# Altium PCB 400589.PcbDoc
Units mm, origin at the board's own origin, x right, y up, seen from the top; angles counter-clockwise.
Board outline 10.16 x 10.16 mm, 2 copper layers (Top Layer, Bottom Layer); 19 components, 14 nets, 51 pads, 50 vias.
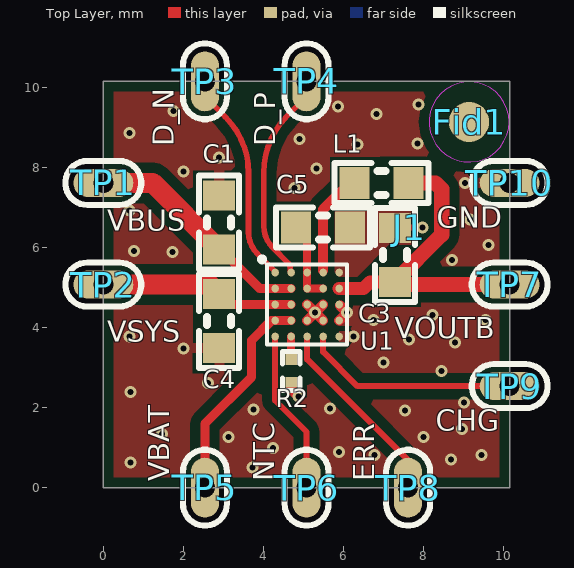
[diagram p0: Top Layer view]
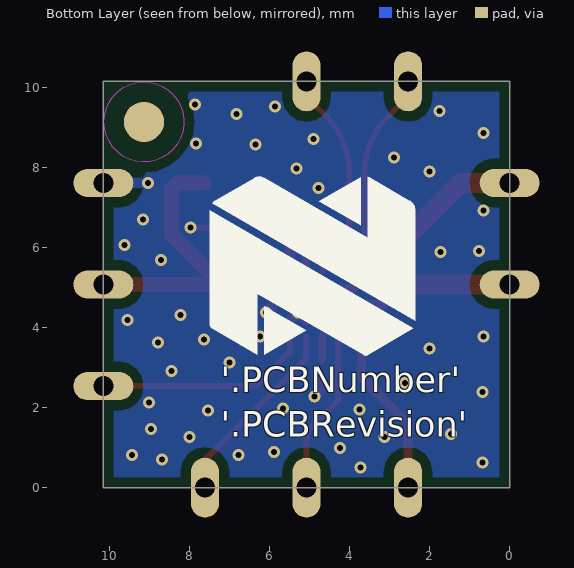
[diagram p1: Bottom Layer view, seen from below]

## Layer stack, top to bottom
Top Solder: solder mask 0.01, Solder Resist, Dk 3.5
Top Layer: signal copper 0.036
Dielectric1: core 0.32, FR-4, Dk 4.8
Bottom Layer: signal copper 0.036
Bottom Solder: solder mask 0.01, Solder Resist, Dk 3.5

## Board outline
0,0 10.16,0 10.16,10.16 0,10.16

## Design rules (kind name [scope] priority, off if disabled: settings)
BoardOutlineClearance [All] p1: gap=0.254 ignorepadtopadclearanceinfootprint=FALSE except(0: Arc-SplitContinuation Track-SplitContinuation SMDPad-SplitContinuation THPad-SplitContinuation Via-SplitContinuation Fill-SplitContinuation Poly-SplitContinuation Region-SplitContinuation Text-SplitContinuation)
Clearance Clearance_microvia [AsMM(ViaDiameter) = 0.3 vs AsMM(ViaDiameter) = 0.3] p1: gap=0.1 ignorepadtopadclearanceinfootprint=FALSE except(0: Arc-Hole Track-Hole SMDPad-Hole THPad-Hole Via-Hole Fill-Hole Poly-Hole Region-Hole Text-Hole)
Clearance ANT_Clerance [InNet('ANT')] p2: gap=0.127 ignorepadtopadclearanceinfootprint=FALSE except(0: Arc-Hole Track-Hole SMDPad-Hole THPad-Hole Via-Hole Fill-Hole Poly-Hole Region-Hole Text-Hole)
Clearance Polygon_Clearance [(InNamedPolygon('Top_Layer-GND')) or (InNamedPolygon('Bottom_Layer-GND')) or (InNamedPolygon('Mid_Layer_1-GND')) or (InNamedPolygon('Mid_Layer_2-GND'))] p3: gap=0.254 ignorepadtopadclearanceinfootprint=FALSE except(0: Arc-Hole Track-Hole SMDPad-Hole THPad-Hole Via-Hole Fill-Hole Poly-Hole Region-Hole Text-Hole)
Clearance [All] p4: gap=0.125 ignorepadtopadclearanceinfootprint=FALSE
ComponentClearance [All] p1 off: gap=0.254 collisioncheckmode=3 verticalgap=0.254 showdistances=FALSE
DiffPairsRouting [All] p1: maxlimit=0.254 minlimit=0.241 mostfreqgap=0.241 toplayer_minwidth=0.14 toplayer_maxwidth=0.381 toplayer_prefwidth=0.14 bottomlayer_minwidth=0.14 bottomlayer_maxwidth=0.381 bottomlayer_prefwidth=0.14 maxuncoupledlength=12.7
FabricationTestPointUsage TestPointUsage [All] p1: valid=0 allowmultiple=FALSE
FabricationTestpoint Testpoint [All] p1: side=3 testpointundercomponent=TRUE minsize=1.016 maxsize=2.54 preferedsize=1.524 minholesize=0 maxholesize=1.016 preferedholesize=0.813 testpointgrid=0.025 allowsidetop=TRUE allowsidebottom=TRUE usegrid=TRUE gridtolerance=0
Height [All] p1 off: minheight=0 maxheight=25.4 prefheight=12.7
HoleSize [All] p1: absolutevalues=TRUE maxlimit=5 minlimit=0.1 maxpercent=80.000 minpercent=20.000
HoleToHoleClearance HoleToHoleClearance_L1L2 [InDrillLayerPair('Top Layer - Mid-Layer 1') vs InDrillLayerPair('Top Layer - Mid-Layer 1')] p1: gap=0.225 allowstackedmicrovias=TRUE
HoleToHoleClearance HoleToHoleClearance_L1L2_L1L3 [InDrillLayerPair('Top Layer - Mid-Layer 1') vs InDrillLayerPair('Top Layer - Mid-Layer 2')] p2: gap=0.225 allowstackedmicrovias=TRUE
HoleToHoleClearance HoleToHoleClearance_L1L3 [InDrillLayerPair('Top Layer - Mid-Layer 2') vs InDrillLayerPair('Top Layer - Mid-Layer 2')] p3: gap=0.225 allowstackedmicrovias=TRUE
HoleToHoleClearance HoleToHoleClearance_L1L3_L3L4 [InDrillLayerPair('Top Layer - Mid-Layer 2') vs InDrillLayerPair('Mid-Layer 2 - Mid-Layer 3')] p4: gap=0.225 allowstackedmicrovias=TRUE
HoleToHoleClearance HoleToHoleClearance_L3L4 [InDrillLayerPair('Mid-Layer 2 - Mid-Layer 3') vs InDrillLayerPair('Mid-Layer 2 - Mid-Layer 3')] p5: gap=0.225 allowstackedmicrovias=TRUE
HoleToHoleClearance HoleToHoleClearance_L3L4_L4L6 [InDrillLayerPair('Mid-Layer 2 - Mid-Layer 3') vs InDrillLayerPair('Mid-Layer 3 - Bottom Layer')] p6: gap=0.225 allowstackedmicrovias=TRUE
HoleToHoleClearance HoleToHoleClearance_L4L6 [InDrillLayerPair('Mid-Layer 3 - Bottom Layer') vs InDrillLayerPair('Mid-Layer 3 - Bottom Layer')] p7: gap=0.225 allowstackedmicrovias=TRUE
HoleToHoleClearance HoleToHoleClearance_L1L2_L1L6 [InDrillLayerPair('Top Layer - Mid-Layer 1') vs InDrillLayerPair('Top Layer - Bottom Layer')] p8: gap=0.275 allowstackedmicrovias=FALSE
HoleToHoleClearance HoleToHoleClearance_L1L3_L1L6 [InDrillLayerPair('Top Layer - Mid-Layer 2') vs InDrillLayerPair('Top Layer - Bottom Layer')] p9: gap=0.275 allowstackedmicrovias=FALSE
HoleToHoleClearance HoleToHoleClearance_L3L4_L1L6 [InDrillLayerPair('Mid-Layer 2 - Mid-Layer 3') vs InDrillLayerPair('Top Layer - Bottom Layer')] p10: gap=0.275 allowstackedmicrovias=FALSE
HoleToHoleClearance HoleToHoleClearance_L4L6_L1L6 [InDrillLayerPair('Mid-Layer 3 - Bottom Layer') vs InDrillLayerPair('Top Layer - Bottom Layer')] p11: gap=0.275 allowstackedmicrovias=FALSE
HoleToHoleClearance HoleToHoleClearance_L1L6 [InDrillLayerPair('Top Layer - Bottom Layer') vs InDrillLayerPair('Top Layer - Bottom Layer')] p12: gap=0.45 allowstackedmicrovias=FALSE
MinimumAnnularRing [All] p1 off: minimumring=0.152
PolygonConnect PolygonConnect_1 [isVia and innet(gnd) or InNet('PVSS')] p1: connectstyle=Direct reliefconductorwidth=0.254 reliefentries=4 polygonreliefangle="90 Angle" airgapwidth=0.254
PolygonConnect [All] p2: connectstyle=Relief reliefconductorwidth=0.254 reliefentries=4 polygonreliefangle="90 Angle" airgapwidth=0.254
RoutingVias [All] p1: holewidth=0.305 width=0.61 viastyle="Through Hole" minholewidth=0.1 minwidth=0.3 maxholewidth=0.711 maxwidth=1.27 useviatemplates=TRUE viatemplateguid#1={46AA5E60-8EE7-483D-A1B2-04B1209392C7} viatemplatename#1=v30h15m0mx0
SilkToSolderMaskClearance SilkscreenOverComponentPads [IsPad] p1: minsilkscreentomaskgap=0.254 clearancetoexposedcopper=TRUE
SolderMaskExpansion [IsVia] p1: expansion=0.076 istentingtop=TRUE
Width [All] p1: maxlimit=0.508 minlimit=0.15 preferedwidth=0.305 minimp=50.000000 maximp=50.000000 favimp=50.000000
22 further rules are at their usual default settings.

## Classes and differential pairs
differential pair class USB: D
differential pair D: +D_P -D_N

## Components (designator, comment, footprint, x,y, rotation, side; value= is the part's Value field where it differs from the comment)
C1 "2.2µF" CAPC1608X06L 2.896,6.629 r270 top
C3 "10µF" CAPC1608X06L 7.29,5.817 r270 top
C4 "10µF" CAPC1608X06L 2.896,4.166 r90 top
C5 "10µF" CAPC1608X06L 5.496,6.502 r180 top
Fid1 "Fiducial mark" Fiducial 9.144,9.144 r0 top
J1 "N.A." "2 PIN STARPOINT" 7.645,6.502 r180 top net-tie
L1 "2.2µH" INDC1608X06L 6.96,7.62 r0 top
R2 "0R" RESC0603X03L_C 4.699,2.921 r90 top
TP1 "TP" "TESTPAD-TH - 0.5mm" 0,7.62 r90 top
TP2 "TP" "TESTPAD-TH - 0.5mm" 0,5.08 r90 top
TP3 "TP" "TESTPAD-TH - 0.5mm" 2.54,10.16 r0 top
TP4 "TP" "TESTPAD-TH - 0.5mm" 5.08,10.16 r0 top
TP5 "TP" "TESTPAD-TH - 0.5mm" 2.54,0 r0 top
TP6 "TP" "TESTPAD-TH - 0.5mm" 5.08,0 r0 top
TP7 "TP" "TESTPAD-TH - 0.5mm" 10.16,5.08 r270 top
TP8 "TP" "TESTPAD-TH - 0.5mm" 7.62,0 r0 top
TP9 "TP" "TESTPAD-TH - 0.5mm" 10.16,2.54 r90 top
TP10 "TP" "TESTPAD-TH - 0.5mm" 10.16,7.62 r90 top
U1 "nPM1100-CAAAC0" BGA25C40P5X5_200X200X50 5.096,4.58 r0 top locked

## Footprints (in the part's own frame and the unit in brackets; to place one, negate y for a bottom-side part, rotate by r counter-clockwise, add the part's x,y. Pads: shape width x height; smd on the part's side, far side on the other; paste and mask are expansions set on the pad)
"2 PIN STARPOINT" [mil]
  round 5.98 smd paste-196.85 mask-196.85: 1(8,0) 2(-8,0)
  Top Layer region: -11,-3 11,-3 11,3 -11,3
BGA25C40P5X5_200X200X50 [mm] "BGA, 25-Leads, Body 2.00x2.00mmx0.50mm, Pitch 0.40mm"
  round 0.193 smd mask+0.075: A1(-0.8,0.8) A2(-0.4,0.8) A3(0,0.8) A4(0.4,0.8) A5(0.8,0.8) B1(-0.8,0.4) B2(-0.4,0.4) B3(0,0.4) B4(0.4,0.4) B5(0.8,0.4) C1(-0.8,0) C2(-0.4,0) C3(0,0) C4(0.4,0) C5(0.8,0) D1(-0.8,-0.4) D2(-0.4,-0.4) D3(0,-0.4) D4(0.4,-0.4) D5(0.8,-0.4) E1(-0.8,-0.8) E2(-0.4,-0.8) E3(0,-0.8) E4(0.4,-0.8) E5(0.8,-0.8)
  silkscreen extent -1.18,-1 1,1.18, body extent -1,-1 1,1, height 0.5
CAPC1608X06L [mm] "Chip Capacitor, 2-Leads, Body 1.6x0.8mm, IPC High Density"
  rect 0.75x0.8 smd: 1(-0.675,0) 2(0.675,0)
  silkscreen extent -1.17,-0.5 1.17,0.5, body extent -0.8,-0.43 0.8,0.43, height 0.8
Fiducial [mm] "Fiducial Mark"
  round 1 smd paste-1 mask+0.5: 0(0,0)
  round 1 smd far side paste-1 mask+0.5: 0(0,0)
  Top Layer keep-out circle w0.01: c0,0 r1
  Bottom Layer keep-out circle w0.01: c0,0 r1
INDC1608X06L [mm] "Chip Inductor, 2-Leads, Body 1.6x0.8mm, IPC High Density"
  rect 0.75x0.8 smd: 1(-0.675,0) 2(0.675,0)
  silkscreen extent -1.17,-0.5 1.17,0.5, body extent -0.8,-0.48 0.8,0.48, height 0.8
RESC0603X03L_C [mm] "Chip Resistor, 2-Leads, Body 0.6x0.3mm, IPC High Density"
  rect 0.27x0.3 smd: 1(-0.285,0) 2(0.285,0)
  silkscreen extent -0.49,-0.22 0.49,0.22, body extent -0.3,-0.15 0.3,0.15, height 0.23
"TESTPAD-TH - 0.5mm" [mm]
  oval 0.7x1.5 hole 0.5: 1(0,0)
  silkscreen extent -0.55,-0.95 0.55,0.95

## Part data
C1: library part C0603-2µ2-25V-X5R, "Capacitor, Ceramic, X5R, ±10%, 25V", Manufacturer=Murata, Manufacturer Part Number=GRM188R61E225KA12D, Part number IPS=N.A., Supplier Part Number 1=490-10731-1-ND, Artikkelnr Noca=N.A., Author=rsk, Component Class=Capacitors, ComponentLink1Description=Datasheet, ComponentLink1URL=https://search.murata.co.jp/Ceramy/image/img/A01X/G101/ENG/GRM188R61E225KA12-01.pdf, ComponentLink2Description="Supplier link", ComponentLink2URL=https://www.murata.com/en-global/products/productdetail?partno=GRM188R61E225KA12%23, Footprint Doc=0603, HelpURL=N.A., LatestRevisionDate=2020-12-16, Note=25V, Pad Count=2, Part Number=C0603-2µ2-25V-X5R, Part number Norautron=N.A., PartId=100200454, Published=2020-12-16, Supplier 1=Digi-Key, Supplier 2=Mouser, Supplier Part Number 2=81-GRM188R61E225KA2D
C3 C4 C5: library part 0603-10u-10V-X7T-GRM188, "CAP CER 10UF 10V X7T 0603", Manufacturer=Murata, Manufacturer Part Number=GRM188D71A106MA73, Part number IPS=00000004696, Supplier Part Number 1=490-7200-1-ND, Artikkelnr Noca=N.A., Component Class=Capacitors, ComponentLink1Description=Datasheet, ComponentLink1URL=N.A., ComponentLink2Description="Supplier link", ComponentLink2URL=N.A., Footprint Doc=0603, HelpURL=https://no.mouser.com/datasheet/2/281/murata_03052018_GRM_Series_1-1310166.pdf, LatestRevisionDate=2020-10-13, Note=10VDC, Pad Count=2, Part Number=0603-10u-10V-X7T-GRM188, PartId=100200414, Published=2018-09-11, Publisher="Nordic Semiconductor", Supplier 1=Digi-Key, Supplier 2=Mouser, Supplier Part Number 2=81-GRM188D71A106MA3D
Fid1: library part Fid-Mark, "Fiducial Mark", Part number IPS=N.A., Artikkelnr Noca=N.A., Component Class=Connectors, ComponentLink1Description=Datasheet, ComponentLink2Description="Supplier link", Footprint Doc=Fiducial, LatestRevisionDate=2009-12-12, Pad Count=1, Part Number=Fid-Mark, PartId=100500073, Published=2009-12-12, Publisher="Nordic Semiconductor"
J1: library part "2 pin starpoint", "Starpoint", Artikkelnr Noca=N.A., Component Class=Connectors, ComponentLink1Description=Datasheet, ComponentLink1URL=N.A., ComponentLink2Description="Supplier link", ComponentLink2URL=N.A., Footprint Doc=N.A., HelpURL=N.A., LatestRevisionDate=2017-08-31, Manufacturer=N.A., Manufacturer Part Number=N.A., Note=N.A., Pad Count=2, Part Number="2 pin starpoint", Part number IPS=N.A., PartId=100500603, Pin Count=2, Published=2017-08-31, Publisher="Nordic Semiconductor", Supplier 1=N.A., Supplier 2=N.A., Supplier Part Number 1=N.A., Supplier Part Number 2=N.A.
L1: library part BRL1608T2R2M, "FIXED IND 2.2UH 500MA 520 MOHM", Manufacturer="Taiyo Yuden", Part number IPS=N.A., Supplier Part Number 1=587-2899-1-ND, Artikkelnr Noca=N.A., Component Class=Inductors, ComponentLink1Description=Datasheet, ComponentLink1URL=N.A., ComponentLink2Description="Supplier link", ComponentLink2URL=http://ds.yuden.co.jp/TYCOMPAS/or/detail.do?productNo=BRL1608T2R2M&dataUnit=M, Footprint Doc=0603, HelpURL=N.A., LatestRevisionDate=2018-04-18, Manufacturer Part Number=BRL1608T2R2M, Note="-40°C ~ 105°C", Pad Count=2, Part Number=BRL1608T2R2M, PartId=100300091, Published=2018-04-18, Supplier 1=Digi-Key, Supplier 2=N.A., Supplier Part Number 2=N.A.
R2: library part R0201-0R, "Resistor, ±5%, 0.05W", Manufacturer=N.A., Part number IPS=00000003245, Artikkelnr Noca=N.A., Component Class=Resistors, ComponentLink1Description=Datasheet, ComponentLink1URL=N.A., ComponentLink2Description="Supplier link", ComponentLink2URL=N.A., Footprint Doc=0201, HelpURL=N.A., LatestRevisionDate=2017-11-09, Manufacturer Part Number=N.A., Note="Chip Res 5%", Pad Count=2, Part Number=R0201-0R, PartId=100100001, Published=2014-11-13, Supplier 1=N.A., Supplier 2=N.A., Supplier Part Number 1=N.A., Supplier Part Number 2=N.A.
TP1 TP2 TP3 TP4 TP5 TP6 TP7 TP8 TP9 TP10: library part "Testpoint TH 0.5mm", "Testpoint, through hole", Manufacturer=N.A., Artikkelnr Noca=N.A., Component Class=Connectors, ComponentLink1Description=Datasheet, ComponentLink1URL=N.A., ComponentLink2Description="Supplier link", ComponentLink2URL=N.A., Footprint Doc=N.A., HelpURL=N.A., LatestRevisionDate=2016-04-22, Manufacturer Part Number=N.A., Note=N.A., Pad Count=1, Part Number="Testpoint TH 0.5mm", Part number IPS=N.A., PartId=100500558, Published=2016-04-22, Supplier 1=N.A., Supplier 2=N.A., Supplier Part Number 1=N.A., Supplier Part Number 2=N.A.
U1: "Li-Ion/Li-Polymer USB battery charger with a high efficiency buck regulator", Manufacturer="Nordic Semiconductor", Part number IPS=N.A., Artikkelnr Noca=N.A., Author=rubr, Component Class=nRF_Devices, ComponentLink1Description=Datasheet, ComponentLink1URL=N.A., ComponentLink2Description="Supplier link", ComponentLink2URL=N.A., Footprint Doc=WLCSP-25, HelpURL=N.A., LatestRevisionDate=2021-04-21, Manufacturer Part Number=nPM1100-CAAAC0, Note=N.A., Pad Count=25, Part Number=nPM1100-CAAAC0, Part number Norautron=N.A., PartId=102000225, Published=2021-04-21, Supplier 1="Nordic Semiconductor", Supplier 2=N.A., Supplier Part Number 1=N.A., Supplier Part Number 2=N.A.

## Via types
v1: diameter 0.3/0.3 (per signal layer), hole 0.15, Top Layer to Bottom Layer, tented both sides, 46 vias
v2: diameter 0.3, hole 0.15, Top Layer to Bottom Layer, tented both sides, 4 vias

## Nets (pads, with @x,y where several pads share a name; then routed paths per layer and width w, separated by ;. In a path a pad name is that pad's centre, name@x,y a point inside that pad or via, vN(x,y) a via of type N, cw(c..) or ccw(c..) an arc to the next point about the centre after c; other vN are vias at no path point)
CHG: TP9.1 U1.E4 | length 5.4
  Top Layer w0.152: U1.E4 5.496,3.394 6.35,2.54 TP9.1
D_N: TP3.1 U1.A1 | length 5.4
  Top Layer w0.14: TP3.1 2.54,9.779 3.054,9.265 cw(c1.663,7.874) 3.63,7.874 3.63,6.388 ccw(c4.404,6.388) 3.857,5.84 4.281,5.417 cw(c4.243,5.38) U1.A1
D_P: TP4.1 U1.A2 | length 5.4
  Top Layer w0.14: U1.A2 cw(c4.742,5.426) 4.677,5.426 4.677,5.479 ccw(c4.483,5.479) 4.62,5.616 4.238,5.998 cw(c4.785,6.545) 4.011,6.545 4.011,7.874 cw(c6.03,7.874) 4.603,9.302 5.08,9.779 TP4.1
DEC: C5.2 U1.A3 U1.B3 U1.B4 | length 2.2
  Top Layer w0.2: C5.2@4.821,6.68 5.096,6.405 U1.A3 U1.B3 U1.B4
ERR: TP8.1 U1.E3 | length 4.8
  Top Layer w0.15: U1.E3 5.096,3.21 7.62,0.686 TP8.1
GND: C1.1 C4.1 J1.2 R2.1 TP10.1 U1.C3 U1.C4 U1.C5 U1.D3 U1.D4 U1.D5 U1.E5 | length 2.1
  Top Layer w0.254: R2.1 4.699,2.464 v1(4.877,2.286) ; U1.D3 v2(5.296,4.38) ; U1.C3 v2(5.296,4.38) ; U1.D4 v2(5.296,4.38) ; U1.C4 v2(5.296,4.38) ; U1.D5 v2(6.096,4.38) U1.C5@5.924,4.552
  other v1: 3.734,0.508 0.686,0.635 8.687,0.711 6.782,0.813 9.449,0.813 5.893,0.889 4.242,0.991 3.124,1.27 8.001,1.27 1.473,1.346 8.966,1.473 7.544,1.93 3.759,1.956 5.664,1.981 9.017,2.134 0.686,2.388 2.616,2.616 8.458,2.921 7.01,3.124 2.007,3.48 8.788,3.632 7.645,3.708 0.66,3.785 6.756,4.191 9.55,4.191 8.23,4.318 8.712,5.69 1.727,5.893 0.762,5.918 9.627,6.071 9.169,6.706 0.66,6.934 4.775,7.493 9.042,7.62 2.007,7.899 5.334,7.976 2.896,8.255 6.35,8.585 7.849,8.611 4.902,8.712 0.66,8.865 6.833,9.347 1.753,9.423 5.867,9.525 7.874,9.576
  other v2: 6.248,3.785 7.976,6.502
ICHG: R2.2 U1.E2 | length 0.6
  Top Layer w0.203: R2.2@4.696,3.206 U1.E2
NetL1_1: L1.1 U1.A4 | length 2.6
  Top Layer w0.25: U1.A4@5.496,5.43 5.496,6.96 6.156,7.62 L1.1
NTC: TP6.1 U1.E1 | length 4.1
  Top Layer w0.15: U1.E1 4.296,2.181 5.08,1.397 TP6.1
PVSS: C3.1 C5.1 J1.1 U1.A5
VBAT: TP5.1 U1.D1 U1.D2 | length 5.4
  Top Layer w0.229: TP5.1 2.54,1.6 3.708,2.769 3.708,3.683 4.205,4.18 U1.D1 U1.D2
VBUS: C1.2 TP1.1 U1.B1 U1.B2 | length 5.8
  Top Layer w0.229: C1.2 2.936,5.954 3.91,4.98 U1.B1 U1.B2
  Top Layer w0.508: TP1.1 1.23,7.62 C1.2
VOUTB: C3.2 L1.2 TP7.1 U1.B5 | length 8.1
  Top Layer w0.33: U1.B5 6.504,4.98 6.666,5.142 C3.2
  Top Layer w0.381: L1.2 8.306,7.62 8.458,7.468 8.458,6.325 7.29,5.156 C3.2 7.351,5.08 TP7.1
VSYS: C4.2 TP2.1 U1.C1 U1.C2 | length 4.9
  Top Layer w0.229: C4.2 3.156,4.58 U1.C1 U1.C2
  Top Layer w0.508: TP2.1 2.656,5.08 C4.2
pads on no net: Fid1.0

## Polygon pours and split planes (outlines as drawn)
GND on Top Layer "Top_Layer-GND" (solid, remove dead copper, pour order 14): 0,0 0,10.16 10.16,10.16 10.16,0
PVSS on Top Layer "PVSS_L01_P013" (solid, pour order 13): 5.791,5.258 5.791,6.909 7.696,6.909 7.696,6.071 7.137,6.071 6.325,5.258
GND on Bottom Layer "Bottom_Layer-GND" (solid, remove dead copper, pour order 11): 0,0 0,10.16 10.16,10.16 10.16,0

## Other copper
Top Layer:
  pour cut-out: 6.22,8.153 7.571,8.153 7.571,7.061 6.221,7.061
  pour cut-out: 7.722,6.909 7.722,6.109 8.179,6.109 8.179,6.909

## Silkscreen, mask and mechanical layers (free items; w line width, h text height)
Top Overlay:
  text "D_N" at 1.93,8.534 h0.89 r90
  text "D_P" at 4.469,8.534 h0.89 r90
  text "GND" at 8.331,6.325 h0.89
  text "VBUS" at 0.102,6.248 h0.89
  text "VOUTB" at 7.29,3.556 h0.89
  text "VSYS" at 0.102,3.48 h0.89
  text "CHG" at 8.306,1.245 h0.89
  text "VBAT" at 1.829,0.167 h0.89 r90
  text "NTC" at 4.453,0.167 h0.89 r90
  text "ERR" at 6.949,0.167 h0.89 r90
Bottom Overlay:
  region: 7.499,4.102 7.499,6.931 2.407,3.991 3.534,3.328 3.546,3.321 3.554,3.317 3.562,3.314 3.571,3.31 3.582,3.307 3.59,3.305 3.595,3.304 3.601,3.304 3.612,3.305 3.618,3.306 3.627,3.309 3.637,3.313 3.645,3.317 3.651,3.319 6.316,4.854 6.315,3.323 7.42,3.968 7.443,3.983 7.457,3.996 7.468,4.01 7.481,4.027 7.49,4.049 7.495,4.067 7.499,4.088
  region: 6.135,3.328 6.135,4.541 5.085,3.935
  region: 4.774,7.167 3.724,6.557 3.724,7.768
  region: 7.44,7.106 2.36,4.173 2.36,6.932 2.361,6.956 2.364,6.979 2.369,7.005 2.378,7.035 2.395,7.07 2.414,7.1 2.445,7.135 2.465,7.153 2.489,7.171 2.506,7.18 3.489,7.75 3.501,7.756 3.523,7.765 3.543,7.773 3.543,6.244 6.136,7.743 6.158,7.755 6.18,7.765 6.195,7.77 6.217,7.776 6.233,7.779 6.249,7.78 6.266,7.781 6.28,7.78 6.291,7.778 6.309,7.775 6.323,7.771 6.345,7.763 6.357,7.758 6.373,7.751 6.391,7.742 7.351,7.183 7.374,7.169 7.394,7.155 7.407,7.143 7.42,7.13 7.434,7.114
  text "'.PCBNumber'" at 7.223,2.388 h0.64
  text "'.PCBRevision'" at 7.223,1.273 h0.64
Board Outline:
  the board outline again, w0.152

## Dimensions
0,0 to 10.16,0 on Dimension
0,10.16 to 0,0 on Dimension